# Altium PCB PCB4270Y_A00.PcbDoc (part 4 of 4)
Units mil, origin at the board's own origin, x right, y up, seen from the top; angles counter-clockwise.
Board outline 3622.05 x 2007.87 mil, 4 copper layers (Top Layer, Signal Layer 2, Signal Layer 3, Bottom Layer), stack 62.992 mil thick; 126 components, 105 nets, 457 pads, 1130 vias.
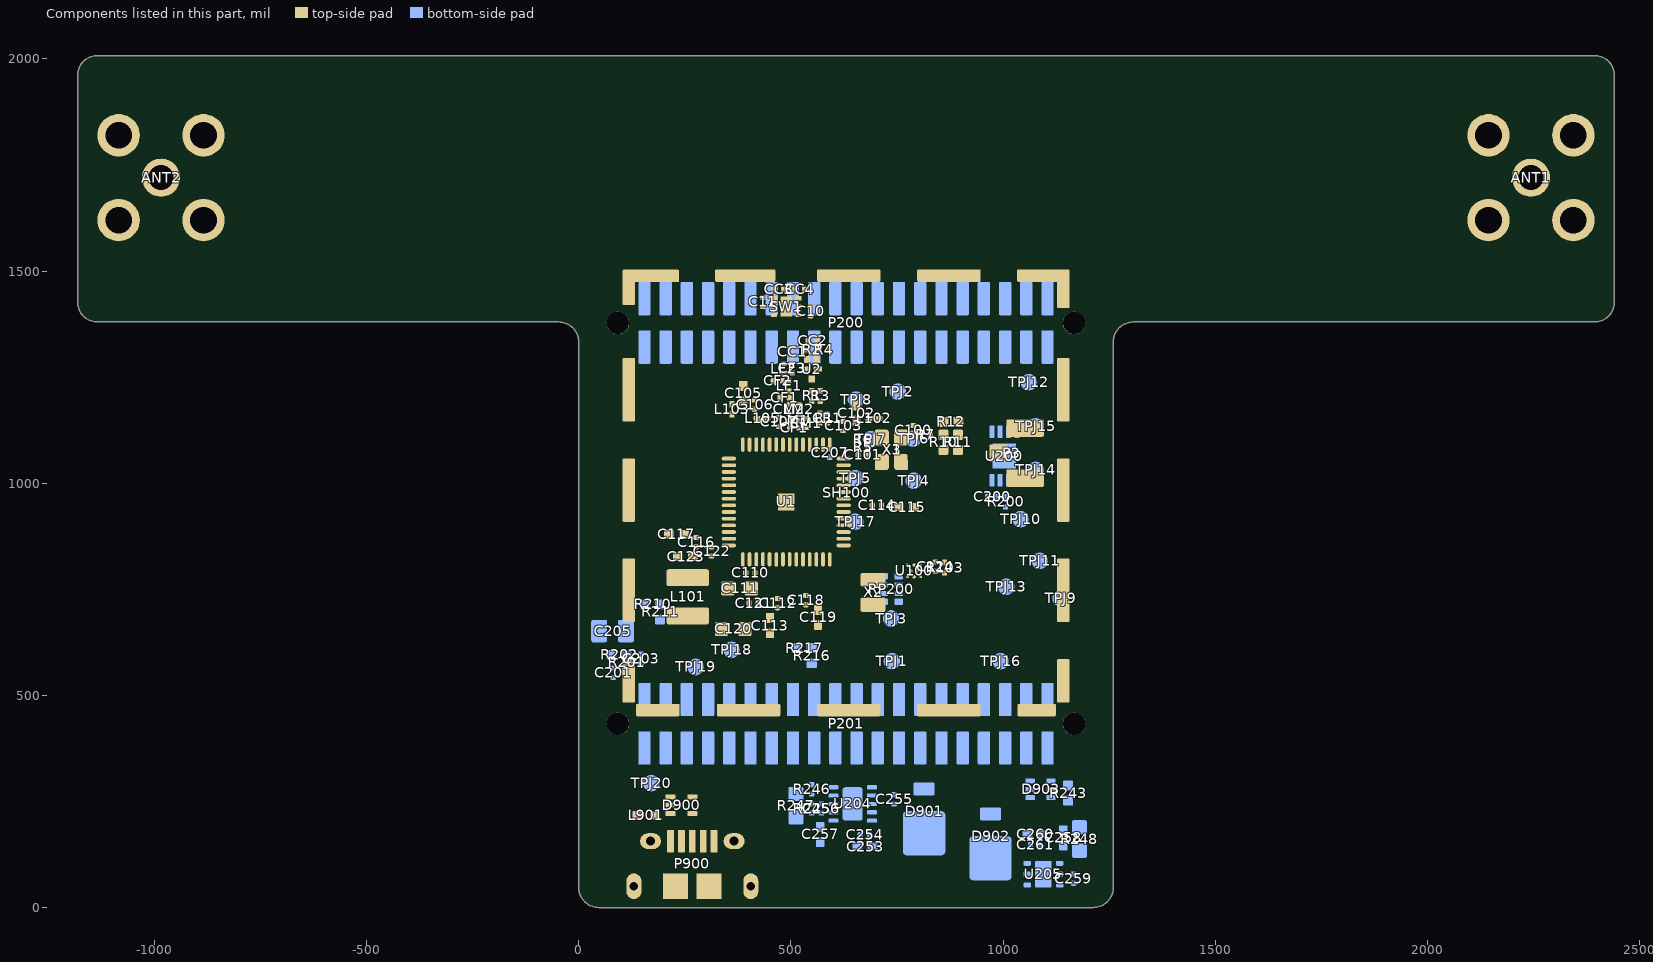
[diagram p6: the components of this part, seen from the top]

## Silkscreen, mask and mechanical layers (free items; w line width, h text height) (continued)
Mechanical 5:
  drawing of 176 lines, arcs and shapes, not listed
  text "TP12" at 1096.6,1239.33 h19.68
  text "TP2" at 787.5,1216.83 h19.68
  text "TP8" at 689.1,1197.93 h19.68
  text "TP15" at 1112.3,1134.93 h19.68
  text "TP6" at 823.7,1106.23 h19.68
  text "TP7" at 724.1,1104.63 h19.68
  text "TP14" at 1112.3,1032.63 h19.68
  text "TP5" at 687.1,1012.93 h19.68
  text "TP4" at 823.7,1007.03 h19.68
  text "TP10" at 1076.9,916.43 h19.68
  text "TP17" at 687.1,910.53 h19.68
  text "TP11" at 1113.19,815.94 h19.68
  text "TP13" at 1043.4,757.03 h19.68
  text "TP9" at 1171.4,729.43 h19.68
  text "TP3" at 771.8,682.23 h19.68
  text "TP18" at 395.8,608.23 h19.68
  text "TP1" at 773.7,581.83 h19.68
  text "TP16" at 1029.6,581.83 h19.68
  text "TP19" at 311.1,568.03 h19.68
  text "TP20" at 206.4,294.43 h19.68
Mechanical 15:
  lines w1: 2794.13,-1687.99 2802.33,-1687.99 ; 2798.23,-1692.09 2798.23,-1683.89
  lines w3.94: -19.69,0 19.68,0 ; 0,-19.68 0,19.69
Mechanical 16:
  lines w3.94: -19.69,0 19.68,0 ; 0,-19.68 0,19.69
Mechanical 26:
  lines w7.87: -4779.53,-1348.43 -4715.55,-1348.43 ; -4779.53,489.17 -4715.55,489.17 ; -4779.53,2326.77 -4715.55,2326.77 ; -2627.95,-3248.03 -2627.95,-3185.04 ; -2627.95,4165.35 -2627.95,4228.35 ; -540.35,-3248.03 -540.35,-3185.04 ; -540.35,4165.35 -540.35,4228.35 ; 1547.24,-3248.03 1547.24,-3185.04 ; 1547.24,4165.35 1547.24,4228.35 ; 3634.84,-3248.03 3634.84,-3185.04 ; 3634.84,4165.35 3634.84,4228.35 ; 5722.44,-1347.44 5786.42,-1347.44 ; 5722.44,2327.76 5786.42,2327.76 ; 5786.42,-3248.03 -4779.53,-3248.03 -4779.53,4228.35 5786.42,4228.35 5786.42,-3247.05 ; -4715.55,-3185.04 5722.44,-3185.04 5722.44,4165.35 -4715.55,4165.35 -4715.55,-3185.04
  text "5" at -3678.15,4186.02 h19.68
  text "4" at -1590.55,4185.04 h19.68
  text "3" at 497.05,4185.04 h19.68
  text "2" at 2584.65,4185.04 h19.68
  text "1" at 4676.18,4185.04 h19.68
  text "D" at 5749.02,3236.22 h19.68
  text "D" at -4752.95,3235.24 h19.68
  text "C" at 5749.02,1397.64 h19.68
  text "C" at -4752.95,1396.65 h19.68
  text "B" at 5749.02,-439.96 h19.68
  text "B" at -4752.95,-440.94 h19.68
  text "A" at 5749.02,-2276.57 h19.68
  text "A" at -4752.95,-2277.56 h19.68
  text "5" at -3678.15,-3227.36 h19.68
  text "4" at -1590.55,-3228.35 h19.68
  text "3" at 497.05,-3228.35 h19.68
  text "2" at 2584.65,-3228.35 h19.68
  text "1" at 4676.18,-3228.35 h19.68
Mechanical 27:
  drawing of 28 lines, arcs and shapes, not listed
  text "Board Title" at 2982.28,-2202.76 h98.43
  text ".BoardTitle" at 3037.4,-2421.26 h137.8
  text "Page Title" at 2982.28,-2585.63 h98.43
  text "Designed:" at 1712.6,-2733.27 h66.93
  text "Approved:" at 2350.39,-2733.27 h66.93
  text "Top Assembly" at 3037.4,-2739.17 h125.98
  text "TAB" at 1772.64,-2831.69 h86.61
  text "RGU" at 2404.53,-2831.69 h86.61
  text "Revision" at 5261.81,-2862.2 h66.93
  text "Document number" at 2982.28,-2873.03 h92.52
  text "Size" at 1712.6,-2920.28 h66.93
  text "BOM Doc. No:" at 1906.5,-2920.28 h66.93
  text ".BoardRevision" at 5272.64,-2982.28 h106.3
  text ".BoardName" at 3037.4,-2986.22 h125.98
  text "A4" at 1735.24,-2993.11 h78.74
  text "<>" at 1929.13,-2993.11 h78.74
  text "Design Created Date:" at 1712.6,-3085.63 h66.93
  text "Sheet Created Date:" at 2959.65,-3085.63 h66.93
  text "Sheet Modified Date:" at 4078.74,-3085.63 h66.93
  text "Sheet" at 5261.81,-3085.63 h66.93
  text "Monday, July 13, 2020" at 1754.92,-3162.4 h66.93
  text "Monday, July 13, 2020" at 3003.94,-3162.4 h66.93
  text "'.Print_Date'" at 4123.03,-3162.4 h66.93
  text "1" at 5309.06,-3162.4 h66.93
  text "of" at 5432.09,-3162.4 h66.93
  text "2" at 5539.37,-3162.4 h66.93
Mechanical 28:
  lines w7.87: -4779.53,-1348.43 -4715.55,-1348.43 ; -4779.53,489.17 -4715.55,489.17 ; -4779.53,2326.77 -4715.55,2326.77 ; -2627.95,-3248.03 -2627.95,-3185.04 ; -2627.95,4165.35 -2627.95,4228.35 ; -540.35,-3248.03 -540.35,-3185.04 ; -540.35,4165.35 -540.35,4228.35 ; 1547.24,-3248.03 1547.24,-3185.04 ; 1547.24,4165.35 1547.24,4228.35 ; 3634.84,-3248.03 3634.84,-3185.04 ; 3634.84,4165.35 3634.84,4228.35 ; 5722.44,-1347.44 5786.42,-1347.44 ; 5722.44,2327.76 5786.42,2327.76 ; 5786.42,-3248.03 -4779.53,-3248.03 -4779.53,4228.35 5786.42,4228.35 5786.42,-3247.05 ; -4715.55,-3185.04 5722.44,-3185.04 5722.44,4165.35 -4715.55,4165.35 -4715.55,-3185.04
  text "5" at -3665.35,4186.02 h19.68
  text "4" at -1577.76,4185.04 h19.68
  text "3" at 509.84,4185.04 h19.68
  text "2" at 2597.44,4185.04 h19.68
  text "1" at 4683.07,4185.04 h19.68
  text "D" at 5761.81,3236.22 h19.68
  text "D" at -4740.16,3235.24 h19.68
  text "C" at 5761.81,1397.64 h19.68
  text "C" at -4740.16,1396.65 h19.68
  text "B" at 5761.81,-439.96 h19.68
  text "B" at -4740.16,-440.94 h19.68
  text "A" at 5761.81,-2276.57 h19.68
  text "A" at -4740.16,-2277.56 h19.68
  text "5" at -3665.35,-3227.36 h19.68
  text "4" at -1577.76,-3228.35 h19.68
  text "3" at 509.84,-3228.35 h19.68
  text "2" at 2597.44,-3228.35 h19.68
  text "1" at 4683.07,-3228.35 h19.68
Mechanical 29:
  drawing of 28 lines, arcs and shapes, not listed
  text "Board Title" at -1975.39,-2202.76 h98.43
  text ".BoardTitle" at -2030.51,-2421.26 h137.8
  text "Page Title" at -1975.39,-2585.63 h98.43
  text "Approved:" at -1343.5,-2733.27 h66.93
  text "Designed:" at -705.71,-2733.27 h66.93
  text "Bottom Assembly" at -2030.51,-2739.17 h125.98
  text "RGU" at -1397.64,-2831.69 h86.61
  text "TAB" at -765.75,-2831.69 h86.61
  text "Revision" at -4254.92,-2862.2 h66.93
  text "Document number" at -1975.39,-2873.03 h92.52
  text "BOM Doc. No:" at -899.61,-2920.28 h66.93
  text "Size" at -705.71,-2920.28 h66.93
  text ".BoardRevision" at -4265.32,-2982.28 h106.3
  text ".BoardName" at -2030.51,-2986.22 h125.98
  text "<>" at -922.24,-2993.11 h78.74
  text "A4" at -728.35,-2993.11 h78.74
  text "Sheet" at -4254.92,-3085.63 h66.93
  text "Sheet Modified Date:" at -3071.85,-3085.63 h66.93
  text "Sheet Created Date:" at -1952.76,-3085.63 h66.93
  text "Design Created Date:" at -705.71,-3085.63 h66.93
  text "2" at -4532.48,-3162.4 h66.93
  text "of" at -4425.2,-3162.4 h66.93
  text "2" at -4302.16,-3162.4 h66.93
  text "'.Print_Date'" at -3116.14,-3162.4 h66.93
  text "Monday, July 13, 2020" at -1997.05,-3162.4 h66.93
  text "Monday, July 13, 2020" at -748.03,-3162.4 h66.93
Mechanical 30:
  lines w7.87: -4950.79,-3502.95 -4950.79,4389.76 6210.63,4389.76 6210.63,-3502.95 -4950.79,-3502.95

## Text inside footprints (layer, text, board x,y; h text height)
Designator39: Mechanical 31 ":" at -478.34,6987.83 h90.55; Mechanical 31 "side. (CTE: Coefficient of Thermal Expansion)" at -300.59,7135.59 h90.55; Mechanical 31 "Vias opened on one side should be plugged only from the other" at -304.25,7292.2 h90.55; Mechanical 31 "Materials in compliance with the RoHS and WEEE directives" at -303.15,12842.52 h90.55; Mechanical 31 "Glass Epoxy FR-4, NEMA Class 2, UL 94V-0, Tg min 150 C" at -303.15,13000 h90.55; Mechanical 31 "to the bottom silkscreen. No marking on the boards is allowed!" at -303.15,12055.12 h90.55; Mechanical 31 "shall be put in the breakaway areas of the panel frame," at -303.15,12212.6 h90.55; Mechanical 31 "All PCB manufacturer's markings (Logo, Week/Year, UL)" at -303.15,12370.08 h90.55; Mechanical 31 "(Avoid areas reserved for DataMatrix, Barcodes or Lables)" at -303.15,12527.56 h90.55; Mechanical 31 "Logo, Week/Year, UL (ON SECONDARY SIDE (BOT))" at -303.15,12685.04 h90.55; Mechanical 31 "IPC-A-600 (current revisions) Class 2, and IPC specifications" at -303.15,11897.64 h90.55; Mechanical 31 "refered to by IPC-A-600" at -303.15,11740.16 h90.55; Mechanical 31 "otherwise." at -303.15,9535.43 h90.55; Mechanical 31 "- Inner radius (contour/outline) 1.2 mm, unless stated" at -303.15,9692.91 h90.55; Mechanical 31 "Use of V-CUT test pads is allowed." at -303.15,9850.39 h90.55; Mechanical 31 "V-CUT minimum remaining thickness 0.5 +/- 0.1 mm." at -303.15,10007.87 h90.55; Mechanical 31 "- If V-CUT, use angle 30 +/- 5 degrees." at -303.15,10165.35 h90.55; Mechanical 31 "by manufacturer for QA purposes." at -303.15,10322.83 h90.55; Mechanical 31 "- Break-away areas may be used for patterns, holes etc." at -303.15,10480.31 h90.55; Mechanical 31 "otherwise use (board manufacturer) standard Build-Up." at -303.15,10637.8 h90.55; Mechanical 31 "- If Build-Up (Stack-Up) is specified, follow Build-Up," at -303.15,10795.28 h90.55; Mechanical 31 "If applicable, the following requirements are valid:" at -303.15,10952.76 h90.55; Mechanical 31 "Gerber files (without alterations)" at -303.15,11110.24 h90.55; Mechanical 31 "Use the balancing of the panel that comes with the" at -303.15,11267.72 h90.55; Mechanical 31 "outline(s), without written consent/approval." at -303.15,11425.2 h90.55; Mechanical 31 "- Copper must not be added or removed from inside the board" at -303.15,11582.68 h90.55; Mechanical 31 "(Electroless Nickel/Immersion Gold)" at -303.15,9062.99 h90.55; Mechanical 31 "ENIG to meet IPC-4552 requirements (current revision)" at -303.15,9220.47 h90.55; Mechanical 31 "Thickness minimum 8 um." at -303.15,8433.07 h90.55; Mechanical 31 "to IPC-SM-840 Class T requirements (current revision)" at -303.15,8590.55 h90.55; Mechanical 31 "Photo Polymer Wet film" at -303.15,8748.03 h90.55; Mechanical 31 "Solder Mask Color: MATTE BLACK" at -303.15,8905.51 h90.55; Mechanical 31 "PLUGGED/FILLED, IPC-4761 (current revision) Type IV-b" at -303.15,7921.26 h90.55; Mechanical 31 "Plugged and Covered Both Sides, Low CTE non-conductive plugging" at -303.15,7763.78 h90.55; Mechanical 31 "material. If Type IV-b is not available as a process, Type IV-a" at -303.15,7606.3 h90.55; Mechanical 31 "for the Top Side, and Overprinted (Tented) Bot Side is OK." at -303.15,7448.82 h90.55; Mechanical 31 "Min via hole may have more than one pad diameter." at -307.99,6052.01 h90.55; Mechanical 31 "Minimum finished via hole diameter   : 0.25 mm (9.8 mils)" at -307.99,6209.49 h90.55; Mechanical 31 "Minimum via pad diameter" at -307.99,6366.97 h90.55; Mechanical 31 ":" at -465.47,6366.97 h90.55; Mechanical 31 "MINIMUM VIA" at -1882.79,6366.97 h90.55; Mechanical 31 ":" at -465.47,6524.45 h90.55; Mechanical 31 "Minimum conductor spacing" at -307.99,6524.45 h90.55; Mechanical 31 "Minimum conductor width" at -307.99,6681.93 h90.55; Mechanical 31 ":" at -465.47,6681.93 h90.55; Mechanical 31 "Cu TRACK(TRACE)" at -1882.79,6524.45 h90.55; Mechanical 31 "(SPECIFICATION CONTINUED ON NEXT PAGE)" at -1882.79,5737.05 h90.55; Mechanical 31 "NOMINAL VALUES for Width, Spacing and VIA Diameter:" at -1882.79,6839.41 h90.55; Mechanical 31 "BOARD THICKNESS" at -1877.95,13314.96 h90.55; Mechanical 31 "BOARD SIZE" at -1877.95,13472.44 h90.55; Mechanical 31 "PANEL SIZE" at -1877.95,13629.92 h90.55; Mechanical 31 "BOARDS pr PANEL" at -1877.95,13787.4 h90.55; Mechanical 31 "PREPARED BY" at -1877.95,13944.88 h90.55; Mechanical 31 "-------------------------------------------------------------------------" at -1877.95,14102.36 h90.55; Mechanical 31 "REVISION" at -1877.95,14259.84 h90.55; Mechanical 31 "DATE" at -1877.95,14417.32 h90.55; Mechanical 31 "DOCUMENT/BOARD" at -1877.95,14732.28 h90.55; Mechanical 31 "PRODUCT OWNER" at -1877.95,14889.76 h90.55; Mechanical 31 ":" at -460.63,13314.96 h90.55; Mechanical 31 ":" at -460.63,11582.68 h90.55; Mechanical 31 ":" at -460.63,11897.64 h90.55; Mechanical 31 ":" at -460.63,12685.04 h90.55; Mechanical 31 ":" at -460.63,13000 h90.55; Mechanical 31 ":" at -460.63,13157.48 h90.55; Mechanical 31 "NO OF LAYERS" at -1877.95,13157.48 h90.55; Mechanical 31 "MATERIAL(S)" at -1877.95,13000 h90.55; Mechanical 31 "MARKINGS" at -1877.95,12685.04 h90.55; Mechanical 31 "QUALITY REQ." at -1877.95,11897.64 h90.55; Mechanical 31 "GENERAL REQ." at -1877.95,11582.68 h90.55; Mechanical 31 ":" at -460.63,7921.26 h90.55; Mechanical 31 ":" at -460.63,8905.51 h90.55; Mechanical 31 ":" at -460.63,9220.47 h90.55; Mechanical 31 ":" at -460.63,9377.95 h90.55; Mechanical 31 "COPPER THK." at -1877.95,9377.95 h90.55; Mechanical 31 "COPPER PASSIV." at -1877.95,9220.47 h90.55; Mechanical 31 "RESIST MASK" at -1877.95,8905.51 h90.55; Mechanical 31 "VIA HOLES" at -1877.95,7921.26 h90.55; Mechanical 31 "LEGEND/SILKSCR." at -1882.79,6996.89 h90.55; Mechanical 31 "SEE BUILD-UP" at -303.15,9377.95 h90.55; Mechanical 31 "WHITE, BOTH SIDES (TOP + BOT)" at -288.3,6996.89 h90.55; Mechanical 31 "4" at -303.15,13157.48 h90.55; Mechanical 31 "1.6 mm +/-10%" at -303.15,13314.96 h90.55; Mechanical 31 "32.0 x 50.0 mm" at -303.15,13472.44 h90.55; Mechanical 31 "210.2 x 205.4 mm" at -303.15,13629.92 h90.55; Mechanical 31 "12 (4 x 3)" at -303.15,13787.4 h90.55; Mechanical 31 "Tamas Bodi" at -303.15,13944.88 h90.55; Mechanical 31 "Silicon Labs" at -303.15,14889.76 h90.55; Mechanical 31 "Page 1" at 1429.14,5440.94 h90.55; Mechanical 31 "Cu TRACK(TRACE)" at -1882.79,6681.93 h90.55; Mechanical 31 ":" at -460.63,13472.44 h90.55; Mechanical 31 ":" at -460.63,13629.92 h90.55; Mechanical 31 ":" at -460.63,13787.4 h90.55; Mechanical 31 ":" at -460.63,13944.88 h90.55; Mechanical 31 ":" at -460.63,14259.84 h90.55; Mechanical 31 ":" at -460.63,14417.32 h90.55; Mechanical 31 ":" at -460.63,14732.28 h90.55; Mechanical 31 ":" at -460.63,14889.76 h90.55; Mechanical 31 "<------------------------------------------------------------------------ 1(2)" at -1877.95,15362.2 h90.55; Mechanical 31 "*** PCB SPECIFICATION FOR BARE BOARD MANUFACTURING ***" at -1877.95,15204.72 h90.55; Mechanical 31 "-------------------------------------------------------------------------" at -1877.95,15047.24 h90.55; Mechanical 31 "If needed, removal of thin (less than 0.25mm) solder" at -303.15,8275.59 h90.55; Mechanical 31 "resist dams (between QFNand BGA pads) is allowed." at -303.15,8098.43 h90.55; Mechanical 31 ": 0.50 mm (20 mils)" at 2907.48,6366.93 h90.55; Mechanical 31 ": 0.10 mm (4 mils)" at 2905.52,6524.61 h90.55; Mechanical 31 ": 0.10 mm (4 mils)" at 2906.5,6680.71 h90.55; Mechanical 32 "NPTH +/− 0.10 mm for d > 5.3 mm" at -1871.26,8729.13 h90.55; Mechanical 32 "NPTH +/− 0.10 mm for d <= 5.3 mm" at -1871.26,8862.8 h90.55; Mechanical 32 "PTH +/− 0.20 mm for d > 5.3 mm" at -1871.45,8995.67 h90.55; Mechanical 32 "PTH +/− 0.15 mm for 2.0 < d <= 5.3 mm" at -1874.01,9125.79 h90.55; Mechanical 32 "PTH +/− 0.10 mm for d <= 2.0 mm" at -1872.63,9260.63 h90.55; Mechanical 32 "Nominal tolerances (if no other tolerancces given)" at -1873.03,9423.43 h90.55; Mechanical 32 "Please follow the gerbers!" at -1886.45,8008.7 h90.55; Mechanical 32 "L1 =====" at -460.63,14574.8 h90.55; Mechanical 32 "TOP ====" at -460.63,14889.76 h90.55; Mechanical 32 "| |// PREPREG or CORE ////// 320um *" at 248.04,14732.28 h90.55; Mechanical 32 "| |========================= 30-38 um Cu (ca) After plating" at 248.04,14889.76 h90.55; Mechanical 32 "/////" at -460.63,14732.28 h90.55; Mechanical 32 "| |========================= 11-18 um Cu" at 248.04,14574.8 h90.55; Mechanical 32 "| |// PREPREG or CORE ////// **" at 248.04,14417.32 h90.55; Mechanical 32 "| |========================= 11-18 um Cu" at 248.04,14259.84 h90.55; Mechanical 32 "| |// PREPREG or CORE ////// 320um *" at 248.04,14102.36 h90.55; Mechanical 32 "| |========================= 30-38 um Cu (ca) After plating" at 248.04,13944.88 h90.55; Mechanical 32 "<------------------------------------------------------------------------ 2(2)" at -1877.95,15362.2 h90.55; Mechanical 32 "/////" at -460.63,14417.32 h90.55; Mechanical 32 "L2 =====" at -460.63,14259.84 h90.55; Mechanical 32 "− − −" at -460.63,14102.36 h90.55; Mechanical 32 "BOT ====" at -460.63,13944.88 h90.55; Mechanical 32 "*)" at -460.63,13629.92 h90.55; Mechanical 32 "The distance between Top-L1 and Bottom-L2 should be" at -460.63,13472.44 h90.55; Mechanical 32 "as close to 320 um as possible! +/-25um tolerance is allowed." at -460.63,13314.96 h90.55; Mechanical 32 "**)" at -460.63,13000 h90.55; Mechanical 32 "Select Center Prepreg thickness in order to reach specified" at -460.63,12842.52 h90.55; Mechanical 32 "board thickness" at -460.63,12685.04 h90.55; Mechanical 32 "100% Electrical Test" at -303.15,12212.6 h90.55; Mechanical 32 "Optical test, AOI (with automatic scanner)" at -303.15,12055.12 h90.55; Mechanical 32 "Visual inspection" at -303.15,11897.64 h90.55; Mechanical 32 "(Generate netlist from Gerber and Drill files)" at -303.15,11740.16 h90.55; Mechanical 32 "Avoid use of 2125 Prepreg" at -303.15,11425.2 h90.55; Mechanical 32 "--------------------------------------------------------------------------------" at -1877.95,10835.63 h90.55; Mechanical 32 "NC DRILL - HOLE INFORMATION:" at -1877.95,10695.55 h90.55; Mechanical 32 "Drill dimensions must be taken from the Excellon (.DRL) file(s), and" at -933.07,10520.67 h90.55; Mechanical 32 "the drill report file(s) (.DRR)." at -933.07,10363.19 h90.55; Mechanical 32 "NON-PLATED holes may have a small center marker in the Gerber files." at -933.07,10205.71 h90.55; Mechanical 32 "Under no circumstance must these Gerber flashes be mistaken for the" at -933.07,10048.23 h90.55; Mechanical 32 "hole drill dimensions!" at -933.07,9890.75 h90.55; Mechanical 32 "The drill data may contain slots (in a separate file)." at -1877.95,9733.27 h90.55; Mechanical 32 "Dimensions for the finished board (after plating)." at -1873.03,9574.61 h90.55; Mechanical 32 "--------------------------------------------------------------------------------" at -1888.38,7451.97 h90.55; Mechanical 32 "--------------------------------------------------------------------------------" at -1879.56,8593.19 h90.55; Mechanical 32 "BUILD UP" at -1877.95,15047.24 h90.55; Mechanical 32 ":" at -460.63,15047.24 h90.55; Mechanical 32 ":" at -460.63,12212.6 h90.55; Mechanical 32 "TEST" at -1877.95,12212.6 h90.55; Mechanical 32 "WARNING" at -1877.95,10520.67 h90.55; Mechanical 32 ":" at -1090.55,10520.67 h90.55; Mechanical 32 "Page 2" at 1429.14,5440.94 h90.55; Mechanical 32 "The board may contain a special testpoint on the bottom layer with an exposed" at -1884.09,8332.01 h90.55; Mechanical 32 "ground copper ring around the testpoint. This exposed copper ring is intentional." at -1881.92,8168.07 h90.55; Mechanical 32 "Fiducials could also have different solrder mask size/shape exposing or covering" at -1884.09,7722.95 h90.55; Mechanical 32 "the surrounding copper. Please follow the gerbers for those as well!" at -1883.7,7583.19 h90.55
P200: Mechanical 12 "2" at 148.92,1421.95 h15.75 r180; Mechanical 12 "1" at 152.92,1341.95 h15.75 r180; Mechanical 12 "40" at 1088.92,1419.95 h15.75 r180; Bottom Overlay "1" at 118.11,1291.34 h49.21; Bottom Overlay "40" at 1173.23,1448.82 h49.21
P201: Mechanical 12 "40" at 1088.92,475.07 h15.75 r180; Mechanical 12 "1" at 152.92,397.07 h15.75 r180; Mechanical 12 "2" at 148.92,477.07 h15.75 r180; Bottom Overlay "40" at 1173.23,503.94 h49.21; Bottom Overlay "1" at 125.98,346.46 h49.21
P900: Mechanical 15 "PCB EDGE" at 216.73,-13.78 h15.75